# Altium PCB Trung PX4 Flight Controller PCB.PcbDoc (part 2 of 2)
Units mm, origin at the board's own origin, x right, y up, seen from the top; angles counter-clockwise.
Board outline 69.46 x 68.69 mm, 4 copper layers (Top Signal, Power, GND, Bottom Signal), stack 1.683 mm thick; 113 components, 114 nets, 501 pads, 234 vias.
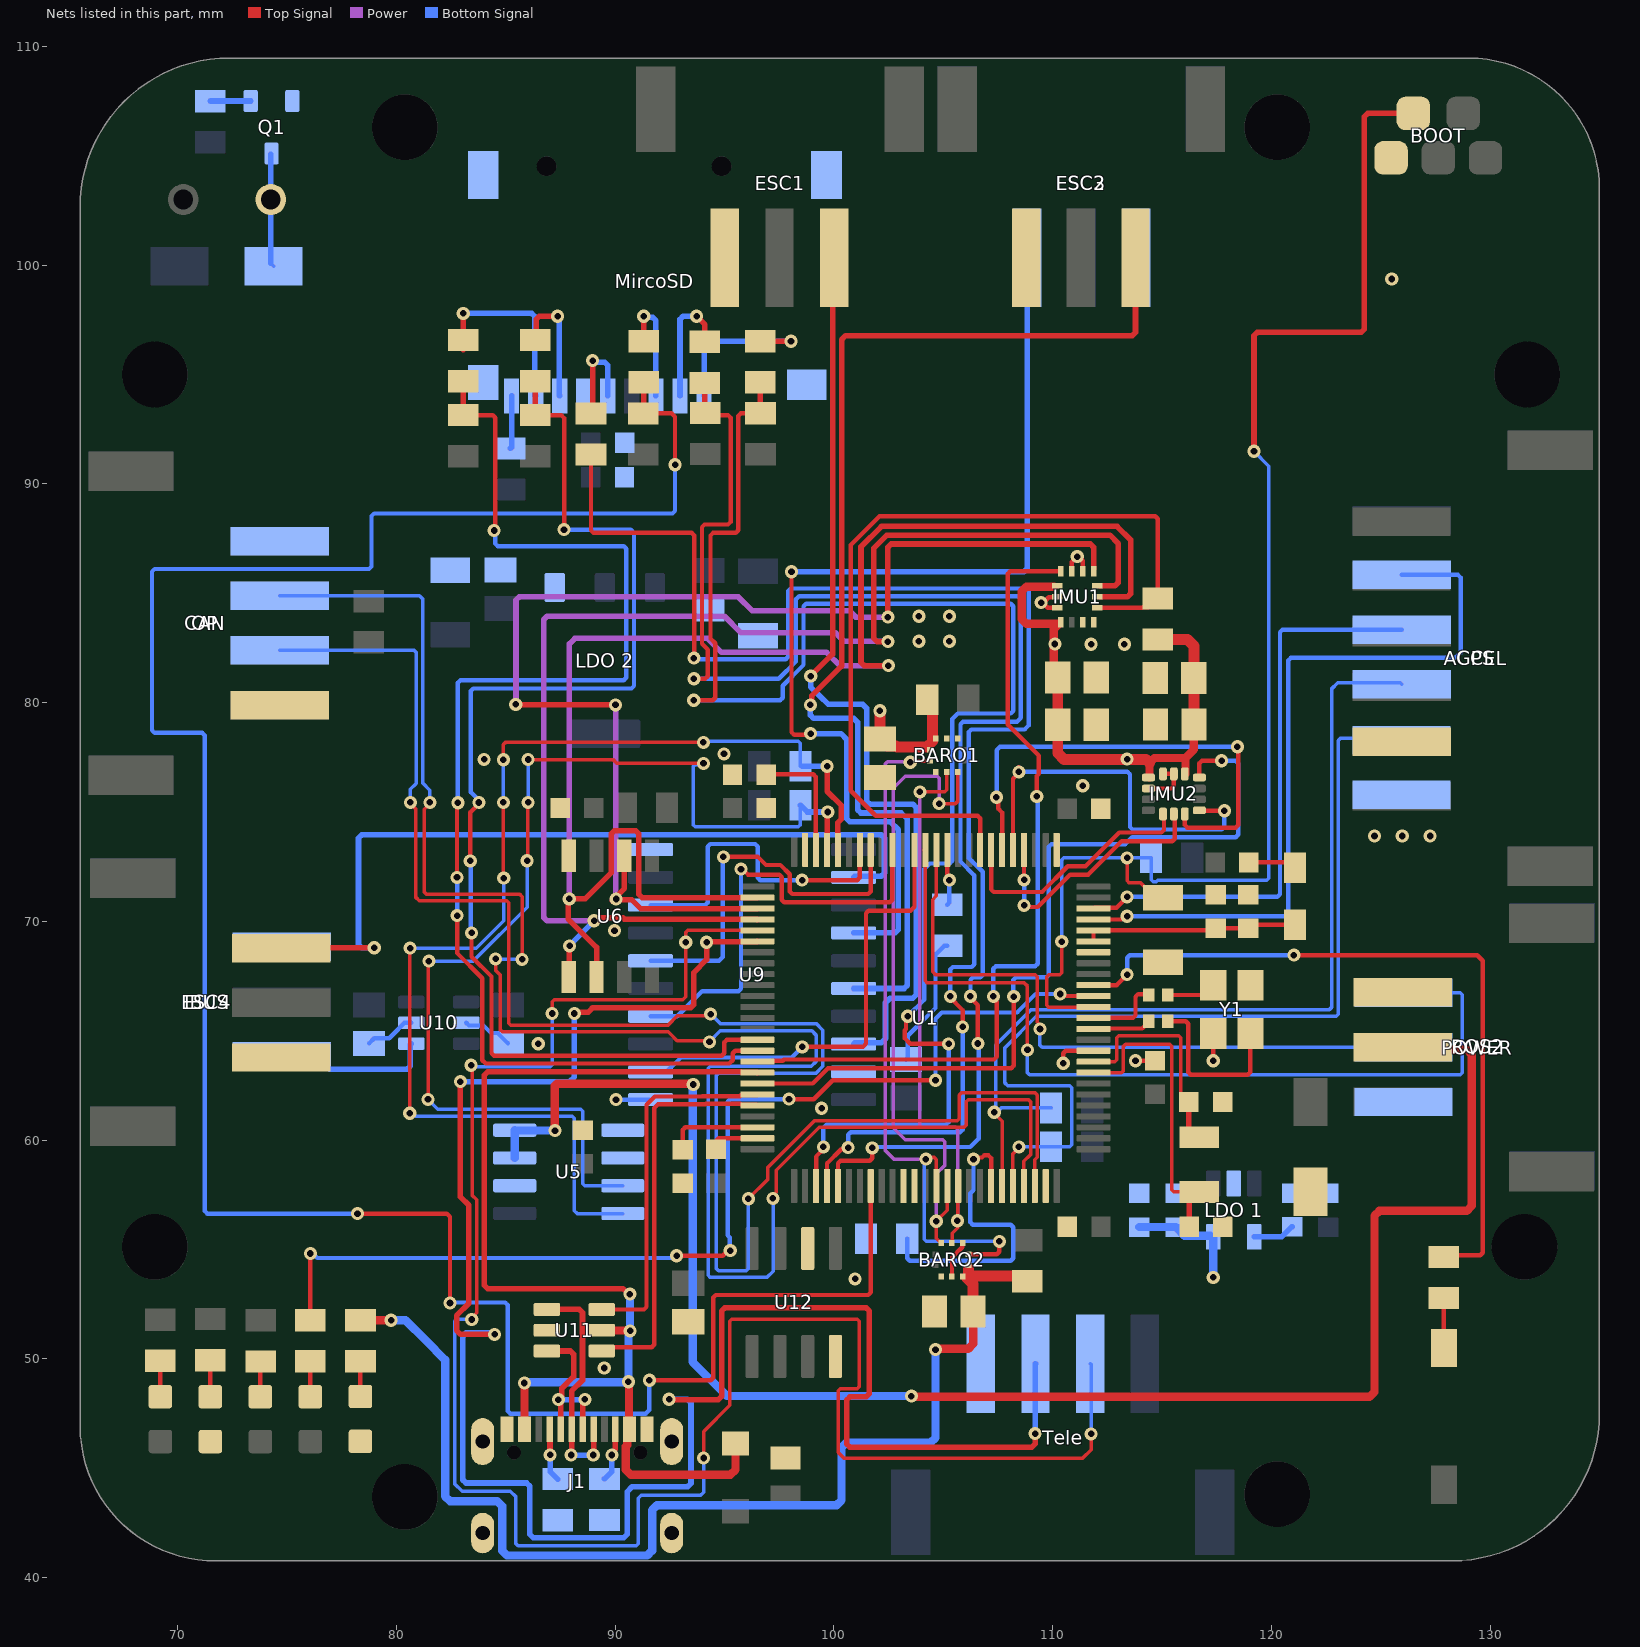
[diagram p4: the nets of this part, all layers, seen from the top]

## Via types
v1: diameter 0.6, hole 0.3, Top Signal to Bottom Signal, tented both sides, 234 vias

## Nets (pads, with @x,y where several pads share a name; then routed paths per layer and width w, separated by ;. In a path a pad name is that pad's centre, name@x,y a point inside that pad or via, vN(x,y) a via of type N, cw(c..) or ccw(c..) an arc to the next point about the centre after c; other vN are vias at no path point) (continued)
GND: "LDO 1.2" "LDO 2.1" ACCEL.2 BARO1.3 BARO1.8 BARO1.9 BARO2.3 BARO2.8 BARO2.9 BOOT.5 C1.1 C2.1 C3.1 C4.1 C5.1 C6.1 C7.1 C8.1 C10.1 C11.1 C12.2 C13.2 C14.1 C15.1 C16.1 C17.2 C18.1 C19.2 C20.1 C21.1 C22.1 C23.1 C24.2 C25.1 C26.1 C27.2 C28.1 C29.1 C30.1 C31.1 C32.1 C33.1 C34.1 C35.1 C36.1 CAN.4 D5.2 ESC1.3 ESC2.3 ESC3.3 ESC4.3 GPS.6 IBUS.3 IMU1.2 IMU1.3 IMU1.6 IMU1.7 IMU1.10 IMU1.11 IMU2.6 IMU2.7 IMU2.9 J1.A1_B12 J1.B1_A12 J1.SH1 J1.SH2 J1.SH3 J1.SH4 MCU.C MircoSD.6 MircoSD.G1 MircoSD.G2 MircoSD.G3 MircoSD.G4 OP.4 POWER.3 Q1.2 R1.2 R3.2 R26.1 R27.1 ROS2.3 SENS.C Tele.4 U1.10 U1.19 U1.26 U1.49 U1.74 U1.99 U5.1 U5.2 U5.6 U6.4 U9.1 U9.10 U9.19 U10.2 U10.5 U11.2 U12.2 U12.8 Y1.2 Y1.4 | length 25.7
  Top Signal w0.2: C1.1@94.615,59.571 94.615,59.967 94.732,60.084 U1.74@96.509,60.084 ; BARO2.9@105.401,53.765 105.401,54.631 105.876,55.106 105.876,55.265 BARO2.3@105.901,55.29 ; v1(109.476,84.569) v1@109.544,84.569 ; IMU1.7@110.181,84.335 109.778,84.335 v1@109.544,84.569 ; IMU1.6@110.199,84.825 110.186,84.811 109.827,84.811 109.584,84.569 v1@109.544,84.569 ; v1(110.49,63.513) 110.49,63.967 110.607,64.084 U1.10@111.869,64.084 ; IMU1.3@110.875,86.147 110.875,86.426 111.121,86.672 v1(111.127,86.672) ; v1@111.127,86.678 111.127,86.728 111.138,86.728 111.376,86.49 111.376,86.029 IMU1.2@111.369,86.021 ; v1(113.792,63.627) 114.673,63.627 C7.1@114.681,63.635 ; IMU2.9@114.383,76.073 115.431,76.073 115.548,76.19 IMU2.6@115.548,76.738 IMU2.7@115.048,76.738 ; Y1.4@117.344,64.874 117.348,64.87 v1(117.348,63.627)
  Bottom Signal w0.2: C34.1@78.755,64.419 78.994,64.658 79.673,64.658 79.835,64.82 80.375,65.36 U10.5@80.69,65.36 ; U10.2@83.2,65.36 83.321,65.24 83.985,65.24 84.331,64.894 84.63,64.894 C33.1@85.105,64.419 ; v1(90.043,61.849) U9.1@91.626,61.849 ; C32.1@103.302,63.686 103.378,63.763 103.378,64.77 104.648,66.04 104.648,68.473 105.056,68.881 R3.2@105.184,68.881
  other v1: 89.509,49.581 100.973,53.652 99.443,61.455 86.49,64.401 89.973,69.578 124.716,73.901 125.986,73.901 127.256,73.901 111.379,76.2 84.013,77.4 94.98,77.658 111.762,82.664 113.286,82.664 103.886,82.804 105.283,82.804 103.886,83.947 105.283,83.947 125.505,99.362
I2C1_SCL: GPS.4 R4.2 U1.95 | length 43.3
  Top Signal w0.16: v1(107.336,61.271) 107.336,61.227 107.696,60.867 107.696,57.91 U1.95@107.689,57.904
  Bottom Signal w0.16: R4.2@109.931,61.468 107.652,61.468 107.455,61.271 v1(107.336,61.271) 107.399,61.334 107.399,64.346 109.022,65.969 122.659,65.969 122.753,66.063 122.753,80.622 123.03,80.899 125.891,80.899 GPS.4@125.954,80.836
I2C1_SDA: GPS.5 R5.2 U1.96 | length 43.1
  Top Signal w0.16: U1.96@108.189,57.904 108.189,59.376 108.458,59.645 v1(108.458,59.69)
  Bottom Signal w0.16: v1(108.458,59.69) R5.2@109.931,59.69 110.777,59.69 110.871,59.784 110.871,62.39 110.777,62.484 107.95,62.484 107.823,62.611 107.823,64.226 109.256,65.659 122.969,65.659 123.063,65.753 123.063,78.265 123.157,78.359 125.877,78.359 GPS.5@125.95,78.286
I2C2_SCL: R6.2 U1.46 U5.4 | length 54.5
  Top Signal w0.16: v1(80.612,61.226) 80.622,61.235 80.622,68.763 v1(80.631,68.773) ; v1(84.892,75.439) 84.892,71.984 v1@84.894,71.982 ; v1(84.895,77.384) 84.895,78.083 84.989,78.177 v1(94.035,78.177)
  Top Signal w0.254: v1(99.695,77.089) 99.695,75.946 100.33,75.311 100.33,74.657 100.189,74.516 U1.46@100.189,73.264
  Bottom Signal w0.16: v1(80.612,61.226) 80.731,61.226 80.87,61.087 88.044,61.087 88.138,60.993 88.138,56.769 88.265,56.642 U5.4@90.354,56.642 ; v1(80.631,68.773) 83.648,68.773 84.91,70.035 v1(84.91,71.979) ; v1@84.895,75.565 v1(84.895,77.384) ; v1(94.035,78.177) 94.09,78.232 98.376,78.232 98.469,78.138 98.469,77.096 R6.2@98.476,77.089 R6.2@98.552,77.089
  Bottom Signal w0.254: R6.2@98.552,77.089 v1(99.695,77.089)
I2C2_SDA: R7.2 U1.47 U5.3 | length 51.3
  Top Signal w0.16: v1(81.45,61.86) 81.47,61.881 81.47,68.165 v1(81.491,68.185) ; v1(85.979,72.771) 86.001,72.793 86.001,75.412 v1(86.023,75.434) ; v1(86.024,77.398) 89.904,77.398 90.079,77.223 v1(94.043,77.223)
  Top Signal w0.254: U1.47@99.689,73.264 99.702,73.277 99.702,74.979 v1(99.722,74.999)
  Bottom Signal w0.16: v1(81.45,61.86) 81.898,61.412 88.425,61.412 88.519,61.318 88.519,58.006 88.613,57.912 U5.3@90.354,57.912 ; v1(81.491,68.185) 83.518,68.185 85.979,70.646 v1(85.979,72.771) ; v1@86.024,75.564 86.024,75.819 v1(86.024,77.398) ; v1(94.043,77.223) 93.985,77.165 93.657,77.165 93.564,77.071 93.564,74.423 93.657,74.329 98.382,74.329 98.476,74.423 R7.2@98.476,75.311
  Bottom Signal w0.254: R7.2@98.476,75.311 98.788,74.999 v1(99.722,74.999)
IBUS_SIGNAL: IBUS.1 U10.4 | length 7.2
  Bottom Signal w0.254: IBUS.1@74.76,63.835 76.36,63.835 76.95,63.246 80.496,63.246 80.645,63.395 80.645,64.365 U10.4@80.69,64.41
IMU1_CS: IMU2.12 U1.32 | length 11.7
  Top Signal w0.2: U1.32@107.189,73.264 107.189,71.46 107.307,71.343 109.522,71.343 110.696,72.517 111.506,72.517 113.049,74.06 114.975,74.06 115.092,74.177 IMU2.12@115.092,74.908
IMU1_DRDY: IMU2.4 U1.69 | length 38.2
  Top Signal w0.2: U1.69@96.509,62.584 99.033,62.584 99.737,63.288 108.11,63.288 108.227,63.405 v1(108.227,66.559) ; IMU2.4@116.713,76.573 116.713,77.226 116.83,77.343 v1(117.729,77.343)
  Bottom Signal w0.2: v1(108.227,66.559) 108.204,66.582 108.204,67.32 108.321,67.437 109.717,67.437 109.834,67.554 109.834,73.415 109.951,73.532 113.324,73.532 113.639,73.846 118.374,73.846 118.491,73.964 118.491,77.226 118.374,77.343 v1(117.729,77.343)
IMU2_CS: IMU1.12 R14.2 U1.33 | length 40.2
  Top Signal w0.2: U1.33@106.689,73.264 106.689,74.705 106.572,74.823 101.921,74.823 100.773,75.97 100.773,87.202 102.09,88.519 114.691,88.519 114.808,88.402 R14.2@114.808,84.76 114.4,84.352 114.116,84.352 114.092,84.328 112.166,84.328 IMU1.12@112.149,84.345
IMU2_DRDY: IMU1.4 U1.67 | length 38.1
  Top Signal w0.2: U1.67@96.509,63.584 97.149,63.584 97.189,63.624 97.304,63.624 97.307,63.627 97.663,63.627 97.72,63.684 107.325,63.684 107.442,63.801 107.442,66.313 107.293,66.461 v1(107.293,66.57) ; v1(109.28,75.708) 109.28,76.646 109.375,76.74 109.375,77.569 107.95,78.994 107.95,85.881 108.067,85.998 IMU1.4@110.35,85.998
  Bottom Signal w0.2: v1(107.293,66.57) 107.293,67.828 107.41,67.945 109.201,67.945 109.318,68.062 109.318,75.67 v1(109.28,75.708)
MOTOR_1: U1.39 U9.2 | length 21.3
  Top Signal w0.2: v1(98.556,64.26) 101.332,64.26 101.473,64.401 101.473,70.368 101.59,70.485 103.505,70.485 103.689,70.669 U1.39@103.689,73.264
  Bottom Signal w0.2: U9.2@91.626,63.119 92.356,63.119 93.015,63.778 98.074,63.778 v1(98.556,64.26)
MOTOR_2: U1.41 U9.4 | length 20.6
  Top Signal w0.2: v1(95.758,72.39) 95.821,72.39 96.075,72.136 97.503,72.136 97.62,72.019 97.62,70.983 97.738,70.866 102.557,70.866 102.674,70.983 102.674,73.248 U1.41@102.689,73.264
  Bottom Signal w0.2: U9.4@91.626,65.659 91.628,65.661 92.839,65.661 93.98,66.802 95.641,66.802 95.758,66.919 v1(95.758,72.39)
MOTOR_3: U1.43 U9.6 | length 17.8
  Top Signal w0.2: v1(94.954,72.944) 96.529,72.944 96.897,72.575 97.559,72.575 97.984,72.15 97.984,71.364 98.101,71.247 101.572,71.247 101.689,71.364 U1.43@101.689,73.264
  Bottom Signal w0.2: U9.6@91.626,68.199 94.752,68.199 94.921,68.368 94.921,72.911 v1(94.954,72.944)
MOTOR_4: U1.44 U9.8 | length 15
  Top Signal w0.2: v1(98.552,71.882) 101.072,71.882 101.189,71.999 U1.44@101.189,73.264
  Bottom Signal w0.2: U9.8@91.626,70.739 94.117,70.739 94.234,70.856 94.234,73.416 94.351,73.533 96.403,73.533 96.52,73.416 96.52,71.999 96.637,71.882 v1(98.552,71.882)
NetC5_2: C5.2 U1.48 | length 5.7
  Top Signal w0.2: C5.2@96.909,76.708 96.92,76.719 99.055,76.719 99.172,76.602 99.172,73.281 U1.48@99.189,73.264
NetC6_2: C6.2 U1.73 | length 4.4
  Top Signal w0.2: C6.2@93.091,59.563 93.091,60.467 93.208,60.584 U1.73@96.509,60.584
NetC9_1: C9.1 FB1.1 | length 1.8
  Top Signal w0.2: C9.1@119.369,72.7 120.836,72.7 FB1.1@121.084,72.451
NetC29_2: "LDO 1.4" C29.2 | length 1.9
  Bottom Signal w0.254: 119.223,55.575 120.472,55.575 120.93,56.033 C29.2@120.95,56.033
NetC39_2: C39.2 Y1.1 | length 7.9
  Top Signal w0.2: C39.2@115.272,65.432 116.088,65.432 116.205,65.315 116.205,63.107 116.322,62.99 118.926,62.99 119.044,63.107 Y1.1@119.044,64.874
NetC40_2: C40.2 Y1.3 | length 2.3
  Top Signal w0.2: C40.2@115.272,66.633 116.902,66.633 Y1.3@117.344,67.074
NetD1_A: MCU.A R24.2 | length 1.7
  Top Signal w0.2: R24.2@71.489,49.936 71.501,49.923 MCU.A@71.501,48.269
NetD2_A: R25.2 SENS.A | length 1.6
  Top Signal w0.2: SENS.A@78.359,48.278 78.359,49.883 R25.2@78.362,49.886
NetD4_C: R34.1 SAFE.C | length 1.6
  Top Signal w0.2: R34.1@76.072,49.887 76.073,49.886 SAFE.C@76.073,48.269
NetD6_C: KERNEL.C R35.1 | length 1.6
  Top Signal w0.2: KERNEL.C@73.787,48.269 73.787,49.871 R35.1@73.798,49.882
NetD7_C: ERROR.C R36.1 | length 1.6
  Top Signal w0.2: ERROR.C@69.215,48.269 R36.1@69.215,49.911
NetJ1_A5: J1.A5 R26.2 | length 2.4
  Top Signal w0.254: J1.A5@87.017,46.782 87.026,46.773 87.026,45.618 v1(87.034,45.609)
  Bottom Signal w0.254: v1(87.034,45.609) 87.034,44.843 R26.2@87.376,44.501
NetJ1_B5: J1.B5 R27.2 | length 2.5
  Top Signal w0.254: v1(89.852,45.604) 89.852,45.697 90.017,45.862 J1.B5@90.017,46.782
  Bottom Signal w0.254: R27.2@89.518,44.509 89.852,44.843 v1(89.852,45.604)
NetJ2_P1: J2.P1 LS1.N Q1.3 | length 5.2
  Bottom Signal w0.16: J2.P1@74.263,100.076 J2.P1@74.39,99.949 ; Q1.3@74.263,105.067 Q1.3@74.295,105.099
  Bottom Signal w0.253: LS1.N@74.263,102.997 Q1.3@74.263,105.067
  Bottom Signal w0.254: J2.P1@74.263,100.076 LS1.N@74.263,102.997
NetP1_1: MircoSD.1 R21.2 | length 8.2
  Top Signal w0.254: R21.2@96.266,96.52 v1(98.044,96.52)
  Bottom Signal w0.254: MircoSD.1@94.068,94.021 94.068,96.371 94.217,96.52 v1(98.044,96.52)
NetP1_2: MircoSD.2 R22.2 | length 5.6
  Top Signal w0.254: v1(93.726,97.663) 94.107,97.282 R22.2@94.107,96.495
  Bottom Signal w0.254: MircoSD.2@92.968,94.021 92.968,97.514 93.117,97.663 v1(93.726,97.663)
NetP1_3: MircoSD.3 R18.2 | length 5.2
  Top Signal w0.254: R18.2@91.313,96.52 v1(91.313,97.663)
  Bottom Signal w0.254: v1(91.313,97.663) 91.362,97.614 91.719,97.614 91.868,97.465 MircoSD.3@91.868,94.021
NetP1_5: MircoSD.5 R17.2 | length 4.6
  Top Signal w0.254: R17.2@88.9,93.218 88.972,93.29 v1(88.972,95.634)
  Bottom Signal w0.254: v1(88.972,95.634) 89.038,95.567 89.519,95.567 89.668,95.419 MircoSD.5@89.668,94.021
NetP1_7: MircoSD.7 R19.2 | length 5.7
  Top Signal w0.254: R19.2@86.36,96.571 86.394,96.605 86.394,97.514 86.543,97.663 v1(87.376,97.663)
  Bottom Signal w0.254: v1(87.376,97.663) 87.44,97.599 87.44,94.049 MircoSD.7@87.468,94.021
NetP1_8: MircoSD.8 R20.2 | length 8.6
  Top Signal w0.254: R20.2@83.058,96.132 R20.2@83.058,96.571 v1(83.058,97.79)
  Bottom Signal w0.254: v1(83.058,97.79) 86.186,97.79 86.335,97.641 86.335,94.054 MircoSD.8@86.368,94.021
NetQ1_1: Q1.1 R28.1 | length 1.8
  Bottom Signal w0.16: R28.1@71.501,107.493 R28.1@71.507,107.499
  Bottom Signal w0.254: R28.1@71.507,107.499 Q1.1@73.345,107.499
NetR1_1: R1.1 U1.94 | length 14.5
  Top Signal w0.2: v1(106.385,59.125) 106.462,59.202 106.775,59.202 106.872,59.299 107.072,59.299 107.189,59.182 U1.94@107.189,57.904
  Bottom Signal w0.2: R1.1@103.353,55.499 103.353,54.6 103.47,54.483 108.087,54.483 108.204,54.6 108.204,56.017 108.087,56.134 106.351,56.134 106.234,56.251 106.234,57.558 106.385,57.71 v1(106.385,59.125)
NetR33_1: "Safety Switch.2" R33.1 | length 2.3
  Top Signal w0.2: 127.889,50.496 R33.1@127.889,52.781
OTG_FS_N: U1.71 U11.4 | length 18.2
  Top Signal w0.2: U11.4@89.393,50.358 89.569,50.534 91.675,50.534 91.792,50.652 91.792,61.467 91.965,61.64 94.125,61.64 94.143,61.658 95.716,61.658 95.749,61.624 96.469,61.624 U1.71@96.509,61.584
OTG_FS_P: U1.70 U11.6 | length 16.6
  Top Signal w0.2: U11.6@89.393,52.258 91.323,52.258 91.44,52.375 91.44,55.406 91.44,61.613 91.819,61.992 93.979,61.992 93.997,62.01 95.716,62.01 95.749,62.044 96.469,62.044 U1.70@96.509,62.084
OUT_1: ESC1.1 U9.18 | length 43
  Top Signal w0.254: v1(98.943,81.21) 99.949,82.215 99.949,100.261 ESC1.1@100.018,100.33
  Bottom Signal w0.254: v1(98.943,81.21) 98.943,80.72 99.38,80.284 99.75,79.914 101.324,79.914 101.496,79.742 101.496,75.506 101.645,75.357 103.614,75.357 103.763,75.208 103.763,66.639 103.614,66.49 102.58,66.49 102.362,66.272 102.362,64.643 102.165,64.446 100.963,64.446 U9.18@100.906,64.389
OUT_2: ESC2.1 U9.16 | length 53.6
  Top Signal w0.254: v1(98.928,79.891) 98.984,79.947 98.984,80.302 100.353,81.671 100.353,96.585 100.542,96.774 113.643,96.774 113.792,96.923 ESC2.1@113.792,100.33
  Bottom Signal w0.254: v1(98.928,79.891) 98.928,79.428 99.077,79.279 100.912,79.279 101.092,79.099 101.092,75.102 101.241,74.953 103.079,74.953 103.359,74.673 103.359,67.078 103.21,66.929 U9.16@100.906,66.929
OUT_3: ESC3.1 U9.14 | length 48
  Top Signal w0.2: v1(98.066,85.979) 98.066,78.651 98.183,78.534 98.892,78.534 v1(98.941,78.583)
  Bottom Signal w0.254: v1(98.066,85.979) 108.686,85.979 108.835,86.128 ESC3.1@108.835,100.341 ; v1(98.941,78.583) 100.326,78.583 100.584,78.325 100.584,74.698 100.733,74.549 102.593,74.549 102.955,74.187 102.955,69.618 102.806,69.469 U9.14@100.906,69.469
OUT_4: ESC4.1 U9.12 | length 37.2
  Top Signal w0.254: ESC4.1@74.745,68.774 74.761,68.79 v1(78.994,68.79)
  Bottom Signal w0.254: v1(78.994,68.79) 78.42,68.79 78.271,68.939 78.271,73.807 78.42,73.956 102.167,73.956 102.316,73.807 102.316,72.213 102.167,72.065 100.962,72.065 U9.12@100.906,72.009
PB2-BOOT1: R3.1 U1.36 | length 2.6
  Top Signal w0.2: U1.36@105.189,73.264 105.189,72.084 105.283,71.99 v1(105.283,71.882)
  Bottom Signal w0.2: R3.1@105.184,70.76 105.283,70.859 v1(105.283,71.882)
PC14: C12.1 U1.8 Y2.2 | length 14.4
  Top Signal w0.16: U1.8@111.869,63.084 113.149,63.084 113.242,63.178 113.242,64.295 113.336,64.389 115.349,64.389 115.443,64.295 115.443,57.725 115.537,57.631 116.612,57.631 Y2.2@116.7,57.631
  Top Signal w0.254: C12.1@116.239,56.035 116.239,57.258 Y2.2@116.612,57.631
PC15: C13.1 U1.9 Y2.1 | length 10.1
  Top Signal w0.16: U1.9@111.869,63.584 112.834,63.584 112.928,63.678 112.928,64.676 113.021,64.77 115.772,64.77 115.865,64.676 115.865,62.107 C13.1@116.23,61.742 ; Y2.1@116.537,60.198 116.634,60.198 Y2.1@116.7,60.131
  Top Signal w0.254: C13.1@116.23,61.742 116.23,60.504 Y2.1@116.537,60.198
PH0: C39.1 U1.12 | length 2.7
  Top Signal w0.2: U1.12@111.869,65.084 111.885,65.1 114.102,65.1 114.398,65.397 C39.1@114.398,65.432
PH1: C40.1 U1.13 | length 3.5
  Top Signal w0.2: U1.13@111.869,65.584 113.675,65.584 113.792,65.701 113.792,66.558 113.909,66.675 114.356,66.675 C40.1@114.398,66.633
RESET: BOOT.4 C8.2 R2.1 U1.14 | length 65.3
  Top Signal w0.16: v1(110.421,69.075) 110.421,67.651 110.327,67.557 109.822,67.557 109.728,67.463 109.728,66.156 109.822,66.062 111.847,66.062 U1.14@111.869,66.084 ; v1(113.411,72.898) 113.411,71.849 113.505,71.755 114.034,71.755 114.717,71.072 C8.2@115.047,71.072
  Top Signal w0.254: v1(119.208,91.489) 119.208,96.775 119.357,96.924 124.109,96.924 124.258,97.073 124.258,106.785 124.407,106.934 BOOT.4@126.492,106.934
  Bottom Signal w0.16: v1(110.421,69.075) 110.421,72.804 110.515,72.898 v1(113.411,72.898) R2.1@114.503,72.898 114.503,71.897 114.597,71.803 114.729,71.803 114.808,71.882 119.794,71.882 119.888,71.976 119.888,90.809 v1(119.208,91.489)
SAFETY_LED: R34.2 U1.15 | length 49.8
  Top Signal w0.2: R34.2@76.072,51.767 R34.2@76.072,51.767 v1(76.073,54.816) ; v1(92.815,54.715) 94.925,54.715 95.157,54.947 v1(95.266,54.947) ; v1(97.952,61.871) 99.082,61.871 99.949,62.738 v1(104.648,62.738) ; v1(110.344,66.679) 110.452,66.679 110.548,66.584 U1.15@111.869,66.584
  Bottom Signal w0.2: v1(76.073,54.816) 76.181,54.816 76.387,54.61 92.601,54.61 92.706,54.715 v1(92.815,54.715) ; v1(95.266,54.947) 95.245,54.968 95.245,55.547 95.145,55.647 95.145,61.754 95.262,61.871 v1(97.952,61.871) ; v1(104.648,62.738) 104.648,65.545 104.936,65.833 108.378,65.833 109.224,66.679 v1(110.344,66.679)
SAFETY_SWITCH: R33.2 U1.16 | length 34.1
  Top Signal w0.2: U1.16@111.869,67.084 112.931,67.084 v1(113.411,67.564) ; v1(121.031,68.453) 129.413,68.453 129.667,68.199 129.667,55.245 129.667,54.854 129.55,54.737 129.286,54.737 127.965,54.737 R33.2@127.889,54.661
  Bottom Signal w0.2: v1(113.411,67.564) 113.411,68.336 113.528,68.453 v1(121.031,68.453)
SD_CD: MircoSD.9 R16.1 | length 2.4
  Bottom Signal w0.254: R16.1@85.217,91.618 85.268,91.669 MircoSD.9@85.268,94.021
SDMMC_CLK: R17.1 U1.80 | length 68.9
  Top Signal w0.2: R17.1@88.9,91.338 88.9,87.874 89.017,87.757 93.506,87.757 93.623,87.64 93.623,82.049 v1(93.606,82.032) ; U1.80@100.189,57.904 100.189,58.938 100.307,59.055 101.637,59.055 101.754,59.172 v1(101.754,59.643) ; v1@106.235,66.52 106.587,66.167 v1(106.587,64.416)
  Bottom Signal w0.2: v1(93.606,82.032) 93.653,81.985 97.8,81.985 97.917,82.102 97.917,85.1 98.034,85.217 108.787,85.217 108.904,85.1 108.904,78.953 108.722,78.771 106.289,78.771 106.172,78.654 106.172,72.895 106.296,72.771 106.299,72.771 106.807,72.263 106.807,67.559 106.69,67.442 106.363,67.442 106.246,67.325 v1(106.246,66.576) ; v1(101.754,59.643) 101.796,59.684 106.24,59.684 106.617,60.061 106.617,64.386 v1(106.587,64.416)
SDMMC_CMD: R8.2 R18.1 U1.83 | length 114.7
  Top Signal w0.2: v1(78.226,56.64) 82.306,56.64 82.456,56.491 v1(82.456,52.552) ; R8.2@91.296,93.215 91.299,93.218 92.593,93.218 92.742,93.069 v1(92.742,90.874) ; v1(91.567,49.022) 94.371,49.022 94.488,49.139 94.488,52.802 94.605,52.919 101.572,52.919 101.689,53.036 U1.83@101.689,57.904
  Top Signal w0.254: R8.2@91.299,93.218 91.313,93.232 R18.1@91.313,94.64
  Bottom Signal w0.2: v1(78.226,56.64) 71.364,56.64 71.247,56.758 71.247,78.496 71.13,78.613 68.951,78.613 68.834,78.73 68.834,85.989 68.951,86.106 78.75,86.106 78.867,86.223 78.867,88.529 78.984,88.646 92.625,88.646 92.742,88.763 v1(92.742,90.874) ; v1(82.456,52.552) 82.482,52.578 84.973,52.578 85.09,52.461 85.09,47.613 85.207,47.496 91.402,47.496 91.567,47.661 v1(91.567,49.022)
SDMMC_D0: R9.2 R19.1 U1.65 | length 55.8
  Top Signal w0.2: v1(83.381,72.763) 83.381,74.98 83.776,75.374 v1(83.776,75.433) ; v1(83.44,69.473) v1(83.44,69.473) 83.439,68.386 84.35,67.475 84.35,63.968 84.467,63.851 94.879,63.851 94.996,63.968 94.996,64.467 95.113,64.584 U1.65@96.509,64.584 ; R9.2@86.36,93.142 87.535,93.142 87.671,93.006 87.671,87.909 v1(87.667,87.906)
  Top Signal w0.254: R9.2@86.36,93.269 R19.1@86.36,94.691
  Bottom Signal w0.2: v1@83.408,72.795 83.408,69.505 v1(83.44,69.473) ; v1(83.776,75.433) 83.776,75.534 83.402,75.908 83.402,80.528 83.519,80.645 90.749,80.645 90.866,80.762 90.866,87.753 90.713,87.906 v1(87.667,87.906)
SDMMC_D1: R10.2 R20.1 U1.66 | length 59.3
  Top Signal w0.2: v1(82.775,72.008) 82.775,75.38 v1(82.816,75.421) ; v1(82.78,70.258) 82.78,68.55 83.933,67.398 83.933,63.653 84.084,63.501 95.225,63.501 95.377,63.653 95.377,63.967 95.494,64.084 U1.66@96.509,64.084 ; R10.2@83.058,93.142 84.408,93.142 84.525,93.025 84.525,87.917 v1(84.474,87.865)
  Top Signal w0.254: R10.2@83.058,93.142 R20.1@83.058,94.564
  Bottom Signal w0.2: v1(82.775,72.008) 82.778,72.005 82.778,70.261 v1(82.78,70.258) ; v1(82.816,75.421) 82.816,80.909 82.933,81.026 90.399,81.026 90.516,81.143 90.516,87.036 90.399,87.153 84.635,87.153 84.518,87.27 84.518,87.821 v1(84.474,87.865)
SDMMC_D2: R11.2 R21.1 U1.78 | length 74.1
  Top Signal w0.2: v1(93.596,80.105) 94.467,80.105 94.584,80.222 94.584,82.708 94.361,82.931 94.361,87.64 94.478,87.757 95.514,87.757 95.631,87.874 95.631,93.101 95.748,93.218 R11.2@96.647,93.218 ; U1.78@99.189,57.904 99.189,59.246 99.524,59.58 v1(99.524,59.688) ; v1(103.378,65.659) 103.301,65.582 103.301,65.074 103.251,65.024 103.251,64.644 103.495,64.4 v1(105.246,64.4)
  Top Signal w0.254: R11.2@96.647,93.218 R21.1@96.647,94.64
  Bottom Signal w0.2: v1(93.596,80.105) 97.546,80.105 97.663,80.222 97.663,80.767 98.617,81.721 98.617,84.4 98.734,84.517 108.087,84.517 108.204,84.4 108.204,79.619 108.087,79.502 105.664,79.502 105.41,79.248 105.41,72.761 105.293,72.644 104.394,72.644 104.14,72.39 104.14,66.421 v1(103.378,65.659) ; v1(99.524,59.688) 99.524,60.561 99.669,60.706 105.129,60.706 105.246,60.823 v1(105.246,64.4)
SDMMC_D3: R12.2 R22.1 U1.79 | length 71.2
  Top Signal w0.2: v1(93.6,81.088) 94.117,81.088 94.234,81.205 94.234,82.423 93.973,82.684 93.973,88.021 94.09,88.138 95.164,88.138 95.281,88.255 95.281,93.025 95.164,93.142 R12.2@94.107,93.142 ; U1.79@99.689,57.904 99.689,58.933 100.335,59.579 100.577,59.579 v1(100.653,59.655) ; v1@105.283,66.548 105.888,65.943 v1(105.888,65.172)
  Top Signal w0.254: R12.2@94.107,93.142 R22.1@94.107,94.615
  Bottom Signal w0.2: v1(93.6,81.088) 97.478,81.088 98.267,81.877 98.267,84.719 98.415,84.867 108.406,84.867 108.554,84.719 108.554,79.303 108.372,79.121 105.908,79.121 105.791,79.004 105.791,72.734 106.424,72.101 106.424,68.03 106.307,67.913 105.444,67.913 105.327,67.795 v1(105.327,66.572) ; v1(100.653,59.655) 100.653,60.239 100.77,60.356 105.771,60.356 105.888,60.473 v1(105.888,65.172)
SPI1_MISO: IMU2.1 U1.30 | length 17.8
  Top Signal w0.2: U1.30@108.189,73.264 108.189,76.518 108.458,76.786 v1@108.458,77.049 ; IMU2.1@116.653,75.057 117.739,75.057 v1@117.856,75.174
  Bottom Signal w0.2: v1(108.458,76.835) 113.421,76.835 113.538,76.718 113.538,74.314 113.655,74.196 117.739,74.196 117.856,74.314 v1(117.856,75.057)
SPI1_MOSI: IMU2.14 U1.31 | length 22.4
  Top Signal w0.2: v1(107.435,75.674) 107.512,75.597 107.512,75.155 107.693,74.974 107.693,73.267 U1.31@107.689,73.264 ; IMU2.14@116.048,74.908 116.048,74.402 116.165,74.285 118.374,74.285 118.491,74.402 118.491,77.936 v1(118.449,77.978)
  Bottom Signal w0.2: v1(107.435,75.674) 107.442,75.681 107.442,77.825 107.595,77.978 v1(118.449,77.978)
SPI1_SCK: IMU2.13 U1.29 | length 11.9
  Top Signal w0.2: U1.29@108.689,73.264 108.695,73.258 108.695,71.899 v1(108.701,71.893) ; v1(108.701,70.729) 108.778,70.653 109.326,70.653 110.81,72.136 111.633,72.136 113.157,73.66 115.475,73.66 115.592,73.777 IMU2.13@115.592,74.908
  Bottom Signal w0.2: v1(108.701,70.729) v1(108.701,71.893)
SPI2_MISO: IMU1.1 U1.53 U6.2 | length 58.2
  Top Signal w0.254: v1(85.461,79.914) 85.472,79.902 90.009,79.902 v1(90.021,79.891) ; v1@89.866,70.943 89.996,71.073 90.424,71.501 U6.2@90.424,73.001 ; v1(90.05,71.02) 90.087,70.982 90.771,70.982 91.169,70.584 U1.53@96.509,70.584 ; v1(102.473,83.904) 102.473,87.1 102.622,87.249 111.726,87.249 111.875,87.1 IMU1.1@111.875,86.109
  Power w0.254: v1@85.471,80.01 85.471,84.687 85.62,84.836 95.631,84.836 96.266,84.201 100.711,84.201 101.008,83.904 v1(102.473,83.904) ; v1(90.021,79.891) 90.035,79.876 90.035,71.034 v1(90.05,71.02)
SPI2_MOSI: IMU1.14 U1.54 U6.5 | length 62
  Top Signal w0.254: U6.5@87.884,67.461 87.903,67.48 87.903,68.861 v1(87.922,68.88) ; v1(89.045,70.024) 89.139,70.024 89.283,70.168 90.36,70.168 90.424,70.104 95.769,70.104 95.777,70.097 96.496,70.097 U1.54@96.509,70.084 ; v1(102.473,82.784) 101.976,82.784 101.827,82.933 101.827,87.058 102.422,87.653 112.618,87.653 113.004,87.268 113.004,85.485 112.855,85.336 IMU1.14@112.148,85.336
  Power w0.254: v1(89.045,70.024) 86.89,70.024 86.741,70.173 86.741,83.798 86.89,83.947 94.996,83.947 95.758,83.185 100.076,83.185 100.457,82.804 102.453,82.804 v1(102.473,82.784)
  Bottom Signal w0.254: v1(87.922,68.88) 87.922,68.891 89.045,70.014 v1(89.045,70.024)
SPI2_SCK: IMU1.13 U1.52 U6.6 | length 68.3
  Top Signal w0.254: U6.6@89.154,67.461 89.154,68.809 87.854,70.108 87.854,70.969 v1(87.908,71.023) 88.627,71.023 89.822,72.217 89.822,73.998 89.971,74.147 90.943,74.147 91.092,73.998 91.092,71.233 91.241,71.084 U1.52@96.509,71.084 ; v1(102.497,81.69) 101.393,81.69 101.244,81.838 101.244,87.122 102.179,88.057 112.952,88.057 113.574,87.435 113.574,84.985 113.425,84.836 IMU1.13@112.148,84.836
  Power w0.254: v1(87.908,71.023) 87.908,82.679 88.16,82.931 94.234,82.931 94.869,82.296 99.667,82.296 100.273,81.69 v1(102.497,81.69)
SPI3_MISO: BARO1.5 BARO2.5 U1.90 | length 30.6
  Top Signal w0.16: v1(104.816,75.383) 105.562,75.383 105.656,75.476 BARO1.5@105.656,76.834 ; BARO2.5@104.901,55.29 104.901,55.302 104.856,55.347 104.844,55.347 104.686,55.505 v1(104.686,56.288) 104.686,56.299 105.177,56.79 105.177,57.892 U1.90@105.189,57.904
  Power w0.16: v1(104.686,56.288) 104.686,58.453 105.068,58.836 105.068,59.925 104.974,60.019 103.264,60.019 102.721,60.562 102.721,76.083 103.264,76.626 104.723,76.626 104.816,76.533 v1(104.816,75.383)
SPI3_MOSI: BARO1.4 BARO2.4 U1.91 | length 26
  Top Signal w0.16: v1(103.937,75.918) 105.062,75.918 105.156,76.012 BARO1.4@105.156,76.834 ; BARO2.4@105.401,55.29 105.41,55.298 105.41,55.74 105.664,55.994 105.664,56.311 105.664,57.878 U1.91@105.689,57.904
  Power w0.16: v1(103.937,75.918) 103.937,60.673 104.03,60.579 105.568,60.579 105.661,60.485 105.661,56.327 v1(105.646,56.311)
SPI3_SCK: BARO1.2 BARO2.2 U1.89 | length 32.7
  Top Signal w0.16: v1(103.492,77.274) 103.529,77.31 104.357,77.31 BARO1.2@104.393,77.347 ; v1(104.208,59.134) 104.278,59.204 104.596,59.204 104.689,59.111 U1.89@104.689,57.904
  Top Signal w0.2: BARO2.2@106.164,54.777 107.452,54.777 107.569,54.894 v1(107.569,55.372)
  Power w0.16: v1(103.492,77.274) 103.466,77.3 102.456,77.3 102.362,77.206 102.362,59.509 102.737,59.134 v1(104.208,59.134)
  Bottom Signal w0.16: v1(104.208,59.134) 104.14,59.066 104.14,55.466 104.234,55.372 v1(107.569,55.372)
UART4_RX: GPS.3 U1.23 | length 26.4
  Top Signal w0.2: U1.23@111.869,70.584 111.909,70.624 112.92,70.624 v1(113.411,71.115)
  Bottom Signal w0.2: v1(113.411,71.115) 113.416,71.12 120.279,71.12 120.396,71.237 120.396,83.219 120.513,83.336 GPS.3@125.954,83.336
UART4_TX: GPS.2 U1.22 | length 34.8
  Top Signal w0.2: U1.22@111.869,70.084 113.156,70.084 113.303,70.231 v1(113.411,70.231)
  Bottom Signal w0.2: v1(113.411,70.231) 120.66,70.231 120.777,70.348 120.777,81.925 120.894,82.042 128.41,82.042 128.651,82.283 128.651,85.719 128.534,85.836 GPS.2@125.954,85.836
UART7_RX: ROS2.2 U1.37 | length 30.4
  Top Signal w0.16: U1.37@104.689,73.264 104.689,71.161 104.521,70.993 104.521,67.691 104.648,67.564 109.201,67.564 109.295,67.47 109.295,65.392 109.34,65.346 109.34,65.162 v1(109.424,65.078)
  Bottom Signal w0.16: v1(109.424,65.078) 109.424,64.336 109.518,64.242 ROS2.2@126.042,64.242
UART7_TX: ROS2.1 U1.38 | length 41
  Top Signal w0.16: U1.38@104.176,73.251 104.176,67.277 104.27,67.183 108.712,67.183 108.853,67.042 v1(108.853,64.125)
  Top Signal w0.254: U1.38@104.176,73.251 U1.38@104.189,73.264
  Bottom Signal w0.16: v1(108.853,64.125) 108.853,63.077 108.947,62.983 128.639,62.983 128.733,63.077 128.733,66.648 128.639,66.742 ROS2.1@126.042,66.742
UART8_RX: OP.3 U1.97 | length 88.3
  Top Signal w0.16: v1(81.534,75.438) 81.534,75.378 81.28,75.124 81.28,71.341 81.374,71.247 85.631,71.247 85.75,71.129 v1(85.75,68.261) ; v1(84.543,68.28) 84.552,68.272 84.552,67.751 84.74,67.562 84.74,65.053 84.848,64.945 92.429,64.945 92.832,64.542 94.263,64.542 v1(94.317,64.489) ; v1(97.213,57.335) 97.213,57.454 97.377,57.618 97.377,58.624 99.332,60.579 105.951,60.579 106.045,60.673 106.045,61.75 106.139,61.844 108.9,61.844 108.994,61.75 108.994,59.337 108.689,59.032 U1.97@108.689,57.904
  Bottom Signal w0.16: OP.3@74.676,84.883 81.059,84.883 81.218,84.724 81.218,76.307 81.534,75.991 v1(81.534,75.438) ; v1(84.543,68.28) 84.553,68.271 85.74,68.271 v1(85.75,68.261) ; v1(94.317,64.489) 94.817,64.99 99,64.99 99.187,64.803 99.187,63.594 98.966,63.373 94.348,63.373 94.254,63.279 94.254,53.815 94.348,53.721 96.943,53.721 97.223,54.002 97.223,57.325 v1(97.213,57.335)
UART8_TX: OP.2 U1.98 | length 83.1
  Top Signal w0.16: v1(80.645,75.438) 80.645,75.378 80.899,75.124 80.899,71.087 81.049,70.937 85.046,70.937 85.14,70.843 85.14,65.349 85.234,65.255 92.421,65.255 92.848,65.682 94.29,65.682 v1(94.365,65.758) ; v1(96.092,57.319) 96.989,58.216 96.989,58.762 97.475,59.248 98.206,59.979 99.116,60.889 105.641,60.889 105.735,60.983 105.735,62.06 105.829,62.154 109.21,62.154 109.304,62.06 109.304,59.208 109.189,59.094 U1.98@109.189,57.904
  Bottom Signal w0.16: OP.2@74.676,82.383 80.814,82.383 80.908,82.289 80.908,76.303 80.645,76.04 v1(80.645,75.438) ; v1(94.365,65.758) 94.385,65.758 94.814,65.329 99.193,65.329 99.497,65.025 99.497,63.372 99.188,63.063 94.729,63.063 94.635,62.969 94.635,54.125 94.729,54.031 95.998,54.031 96.092,54.125 v1(96.092,57.319)
USART2_RX: U1.87
USART2_TX: U1.86
USART3_RX: Tele.3 U1.56 | length 93.4
  Top Signal w0.254: v1(82.932,62.675) 82.932,57.403 83.312,57.023 83.312,52.539 82.754,51.982 82.754,51.305 82.943,51.116 v1(84.491,51.116) ; v1(88.138,65.786) 88.204,65.852 88.78,65.852 88.968,66.04 93.45,66.04 93.599,66.189 93.599,67.657 94.187,68.246 v1(94.187,69.046) 94.213,69.071 96.496,69.071 U1.56@96.509,69.084 ; v1(92.47,48.15) 92.487,48.133 94.72,48.133 94.869,48.282 94.869,52.187 95.018,52.336 101.479,52.336 101.628,52.187 101.628,48.409 101.479,48.26 100.733,48.26 100.584,48.111 100.584,46.111 100.733,45.962 109.056,45.962 109.204,46.111 v1(109.204,46.582)
  Power w0.254: v1(94.187,69.046) v1@94.234,69.092 ; v1(109.204,46.582) v1@109.217,46.595
  Bottom Signal w0.254: v1(82.932,62.675) 87.926,62.675 88.138,62.887 v1(88.138,65.786) ; v1(84.491,51.116) 84.426,51.181 83.185,51.181 83.036,51.032 83.036,44.472 83.185,44.323 85.957,44.323 86.106,44.174 86.106,41.974 86.255,41.825 90.402,41.825 90.551,41.974 90.551,43.92 90.786,44.155 93.323,44.155 93.472,44.304 93.472,47.984 93.306,48.15 v1(92.47,48.15) ; v1(109.204,46.582) 109.204,49.768 Tele.3@109.22,49.784
USART3_TX: Tele.2 U1.55 | length 92.2
  Top Signal w0.16: v1(83.417,63.424) 83.462,63.379 83.462,57.487 83.669,57.279 83.669,52.113 83.45,51.894 v1(83.45,51.8) ; v1(87.122,65.786) 87.122,66.327 87.216,66.421 93.091,66.421 93.23,66.56 v1(93.23,69.046) 93.23,69.49 93.324,69.584 U1.55@96.509,69.584 ; v1(94.049,45.466) 94.049,46.678 95.25,47.879 95.25,51.715 95.344,51.808 101.067,51.808 101.161,51.715 101.161,48.735 101.067,48.641 100.297,48.641 100.203,48.547 100.203,45.72 100.457,45.466 111.379,45.466 111.762,45.849 v1(111.762,46.568)
  Power w0.16: v1(111.762,46.568) v1@111.787,46.593
  Bottom Signal w0.16: v1(83.417,63.424) 83.484,63.357 87.028,63.357 87.122,63.45 v1(87.122,65.786) ; v1(83.45,51.8) 82.756,51.8 82.662,51.706 82.662,44.292 83.012,43.942 85.217,43.942 85.471,43.688 85.471,41.546 85.565,41.452 90.965,41.452 91.059,41.546 91.059,43.62 91.205,43.766 93.906,43.766 94.049,43.909 v1(94.049,45.466) ; Tele.2@111.72,49.784 111.762,49.742 v1(111.762,46.568)
USB_CONN_N: J1.A7 J1.B7 U11.3 | length 7.6
  Top Signal w0.254: U11.3@86.883,50.358 87.956,50.358 88.105,50.209 88.105,49.189 87.564,48.648 v1@87.564,48.136 ; v1(87.412,48.136) 87.517,48.031 87.478,47.992 87.478,47.977 87.517,47.938 J1.B7@87.517,46.782 ; J1.A7@88.517,46.782 88.517,47.944 88.622,48.049 v1(88.622,48.143)
  Bottom Signal w0.254: v1(87.412,48.136) 87.415,48.14 88.619,48.14 v1(88.622,48.143)
USB_CONN_P: J1.A6 J1.B6 U11.1 | length 10.9
  Top Signal w0.254: U11.1@86.883,52.258 88.362,52.258 88.511,52.109 88.511,49.02 88.017,48.526 J1.A6@88.017,46.782 88.017,45.472 v1@88.011,45.466 ; J1.B6@89.017,46.782 89.017,45.476 v1@89.027,45.466
  Bottom Signal w0.254: v1(87.987,45.603) v1(89.003,45.603)
VADC: C10.2 C11.2 FB1.2 U1.20 U1.21 | length 9.8
  Top Signal w0.2: U1.20@111.869,69.084 U1.21@111.869,69.584 117.107,69.584 117.202,69.678 119.066,69.678 119.072,69.685 119.239,69.851 FB1.2@121.084,69.851
VBAT_IN: POWER.2 U5.7 U5.8 | length 79.1
  Top Signal w0.38: v1(87.256,60.432) 87.249,60.439 87.249,62.484 87.347,62.582 93.534,62.582 v1(93.574,62.542) ; v1(103.544,48.299) 103.583,48.26 124.491,48.26 124.714,48.483 124.714,56.546 124.937,56.769 128.936,56.769 129.159,56.992 129.159,63.912 128.936,64.135 126.126,64.135 POWER.2@126.01,64.251
  Bottom Signal w0.38: U5.7@85.414,59.182 U5.8@85.414,60.452 85.424,60.442 87.246,60.442 v1(87.256,60.432) ; v1(93.574,62.542) 93.545,62.514 93.545,49.863 95.109,48.299 v1(103.544,48.299)
VBUS: D3.A J1.A4_B9 J1.B4_A9 U1.68 U11.5 | length 51.8
  Top Signal w0.254: v1(90.678,52.959) 90.61,52.959 90.356,53.213 84.175,53.213 84.026,53.362 84.026,62.97 84.175,63.119 95.754,63.119 95.777,63.097 96.496,63.097 U1.68@96.509,63.084
  Top Signal w0.38: v1(85.852,48.895) 85.86,48.888 85.86,46.79 J1.A4_B9@85.867,46.782 ; U11.5@89.393,51.308 89.407,51.294 90.677,51.294 v1(90.691,51.281) ; v1(90.611,48.951) 90.639,48.923 90.639,46.81 J1.B4_A9@90.667,46.782 90.557,46.672 90.557,46.057 90.492,45.992 90.492,44.927 90.715,44.704 95.281,44.704 95.504,44.927 D3.A@95.504,46.127
  Bottom Signal w0.38: v1(85.852,48.895) 85.88,48.923 90.583,48.923 v1(90.611,48.951) 90.611,51.142 90.691,51.221 v1(90.691,51.281) 90.684,51.287 90.684,52.953 v1(90.678,52.959)
VCC_3V3_SENS: "LDO 1.5" BARO1.1 BARO1.10 BARO2.1 BARO2.10 C14.2 C15.2 C16.2 C17.1 C18.2 C19.1 C30.2 C31.2 IMU1.5 IMU1.8 IMU2.5 IMU2.8 R13.1 R14.1 R15.1 R25.1 | length 89.1
  Top Signal w0.38: v1(79.762,51.764) 79.761,51.765 R25.1@78.363,51.765 ; v1(104.648,50.419) 104.69,50.461 106.147,50.461 106.37,50.684 C15.2@106.37,52.167 ; IMU1.5@110.065,85.301 108.808,85.301 108.585,85.078 108.585,83.82 108.808,83.597 110.293,83.597 110.054,83.358 110.054,81.326 C16.2@110.236,81.144 ; IMU2.8@114.427,76.588 114.427,77.247 114.65,77.47 116.078,77.47 ; IMU2.5@116.078,76.738 116.078,77.47 ; C18.2@116.459,78.996 116.459,77.851 116.078,77.47 ; R25.1@78.362,51.766 R25.1@78.363,51.765
  Top Signal w0.5: v1(102.108,79.629) C14.2@102.108,78.341 102.433,78.016 102.844,78.016 102.886,77.974 104.263,77.974 104.521,78.232 104.521,79.883 R13.1@104.267,80.137 ; 106.067,53.72 106.37,53.417 C15.2@106.37,52.167 ; 106.164,54.102 106.164,53.783 108.599,53.783 R15.1@108.839,53.543 ; C16.2@110.236,81.144 C17.1@110.236,78.985 110.236,77.695 110.529,77.402 114.273,77.402 114.427,77.247 ; R14.1@114.808,82.88 116.166,82.88 116.459,82.587 C18.2@116.459,78.996
  Bottom Signal w0.38: v1(79.762,51.764) 80.424,51.764 81.35,50.837 82.235,49.953 82.235,43.714 82.457,43.492 84.613,43.492 84.836,43.269 84.836,41.229 85.059,41.006 91.471,41.006 91.694,41.229 91.694,43.084 91.917,43.307 100.131,43.307 100.353,43.53 100.353,45.943 100.576,46.166 104.425,46.166 104.648,46.389 v1(104.648,50.419) ; C31.2@113.965,56.025 115.636,56.025 116.035,55.626 117.198,55.626 117.25,55.575 117.343,55.575 117.348,55.57 117.348,55.118 v1(117.348,53.721)
  other v1: 113.409,77.417 110.109,82.677
pads on no net: "LDO 2.4" ACCEL.SH1 ACCEL.SH2 BARO1.7 BARO2.7 CAN.SH1 CAN.SH2 ESC1.2 ESC1.SH1 ESC1.SH2 ESC2.2 ESC2.SH1 ESC2.SH2 ESC3.2 ESC3.SH1 ESC3.SH2 ESC4.2 ESC4.SH1 ESC4.SH2 GPS.SH1 GPS.SH2 IBUS.SH1 IBUS.SH2 IMU1.9 IMU2.2 IMU2.3 IMU2.10 IMU2.11 J1. J1.A8 J1.B8 MircoSD. OP.SH1 OP.SH2 POWER.SH1 POWER.SH2 ROS2.SH1 ROS2.SH2 Tele.SH1 Tele.SH2 U1.2 U1.7 U1.17 U1.18 U1.28 U1.34 U1.40 U1.42 U1.45 U1.57 U1.77 U1.88 U12.5

## Polygon pours and split planes (outlines as drawn)
+3.3 on Power "+3.3_L02_P002" (solid, remove dead copper, pour order 2): 72.378,109.461 128.918,109.461 cw(c128.915,103.373) 135.003,103.376 135.003,47.5 cw(c128.272,47.5) 128.272,40.769 71.76,40.767 cw(c71.709,46.932) 65.545,46.868 65.549,102.633 cw(c72.371,102.639)
VCC_3V3_SENS on Power "VCC_3V3_SENS_L02_P001" (solid, pour order 1): 99.949,81.788 108.458,81.788 108.458,86.868 119.634,86.868 119.634,74.549 99.949,74.549
VCC_3V3_SENS on Power "VCC_3V3_SENS_L02_P008" (solid, pour order 8): 128.651,86.868 133.096,86.868 133.096,49.657 132.969,49.53 118.999,49.53 118.999,61.341 128.651,61.341
VCC_3V3_SENS on Power "VCC_3V3_SENS_L02_P007" (solid, pour order 7): 119.634,86.868 128.651,86.868 128.651,77.47 119.634,77.47
VCC_3V3_SENS on Power "VCC_3V3_SENS_L02_P005" (solid, pour order 5): 103.759,49.53 103.818,49.589 103.818,54.832 118.967,54.832 118.999,54.864 118.999,49.53
GND on GND "GND_L03_P000" (solid, remove dead copper, pour order 0): 72.378,109.461 128.918,109.461 cw(c128.915,103.373) 135.003,103.376 135.003,47.5 cw(c128.272,47.5) 128.272,40.769 71.76,40.767 cw(c71.709,46.932) 65.545,46.868 65.549,102.633 cw(c72.371,102.639)
GND on Top Signal "GND_L01_P012" (solid, remove dead copper, pour order 12): 72.378,109.461 128.918,109.461 cw(c128.915,103.373) 135.003,103.376 135.003,47.5 cw(c128.272,47.5) 128.272,40.769 71.76,40.767 cw(c71.709,46.932) 65.545,46.868 65.549,102.633 cw(c72.371,102.639)
GND on Bottom Signal "GND_L04_P011" (solid, remove dead copper, pour order 11): 72.378,109.461 128.918,109.461 cw(c128.915,103.373) 135.003,103.376 135.003,47.5 cw(c128.272,47.5) 128.272,40.769 71.76,40.767 cw(c71.709,46.932) 65.545,46.868 65.549,102.633 cw(c72.371,102.639)

## Silkscreen, mask and mechanical layers (free items; w line width, h text height)
Mechanical 1:
  lines w0.254: 65.406,102.78 cw(c72.272,102.762) 72.29,109.627 129.071,109.623 cw(c128.96,103.385) 135.198,103.274 135.186,47.339 cw(c128.37,47.417) 128.292,40.602 71.632,40.589 cw(c71.677,46.856) 65.41,46.9 65.406,102.78